# Altium PCB VA_HUB_PCB.PcbDoc (part 9 of 12)
Units mil, origin at the board's own origin, x right, y up, seen from the top; angles counter-clockwise.
Board outline 4408 x 3619 mil, 8 copper layers (Top Layer, Routing 1, Routing 2, Power Plane, GND Plane, Routing 3, Routing 4, Bottom Layer), stack 85.156 mil thick; 569 components, 440 nets, 2911 pads, 1518 vias.
Unrouted connection lines stored in the file: 46.
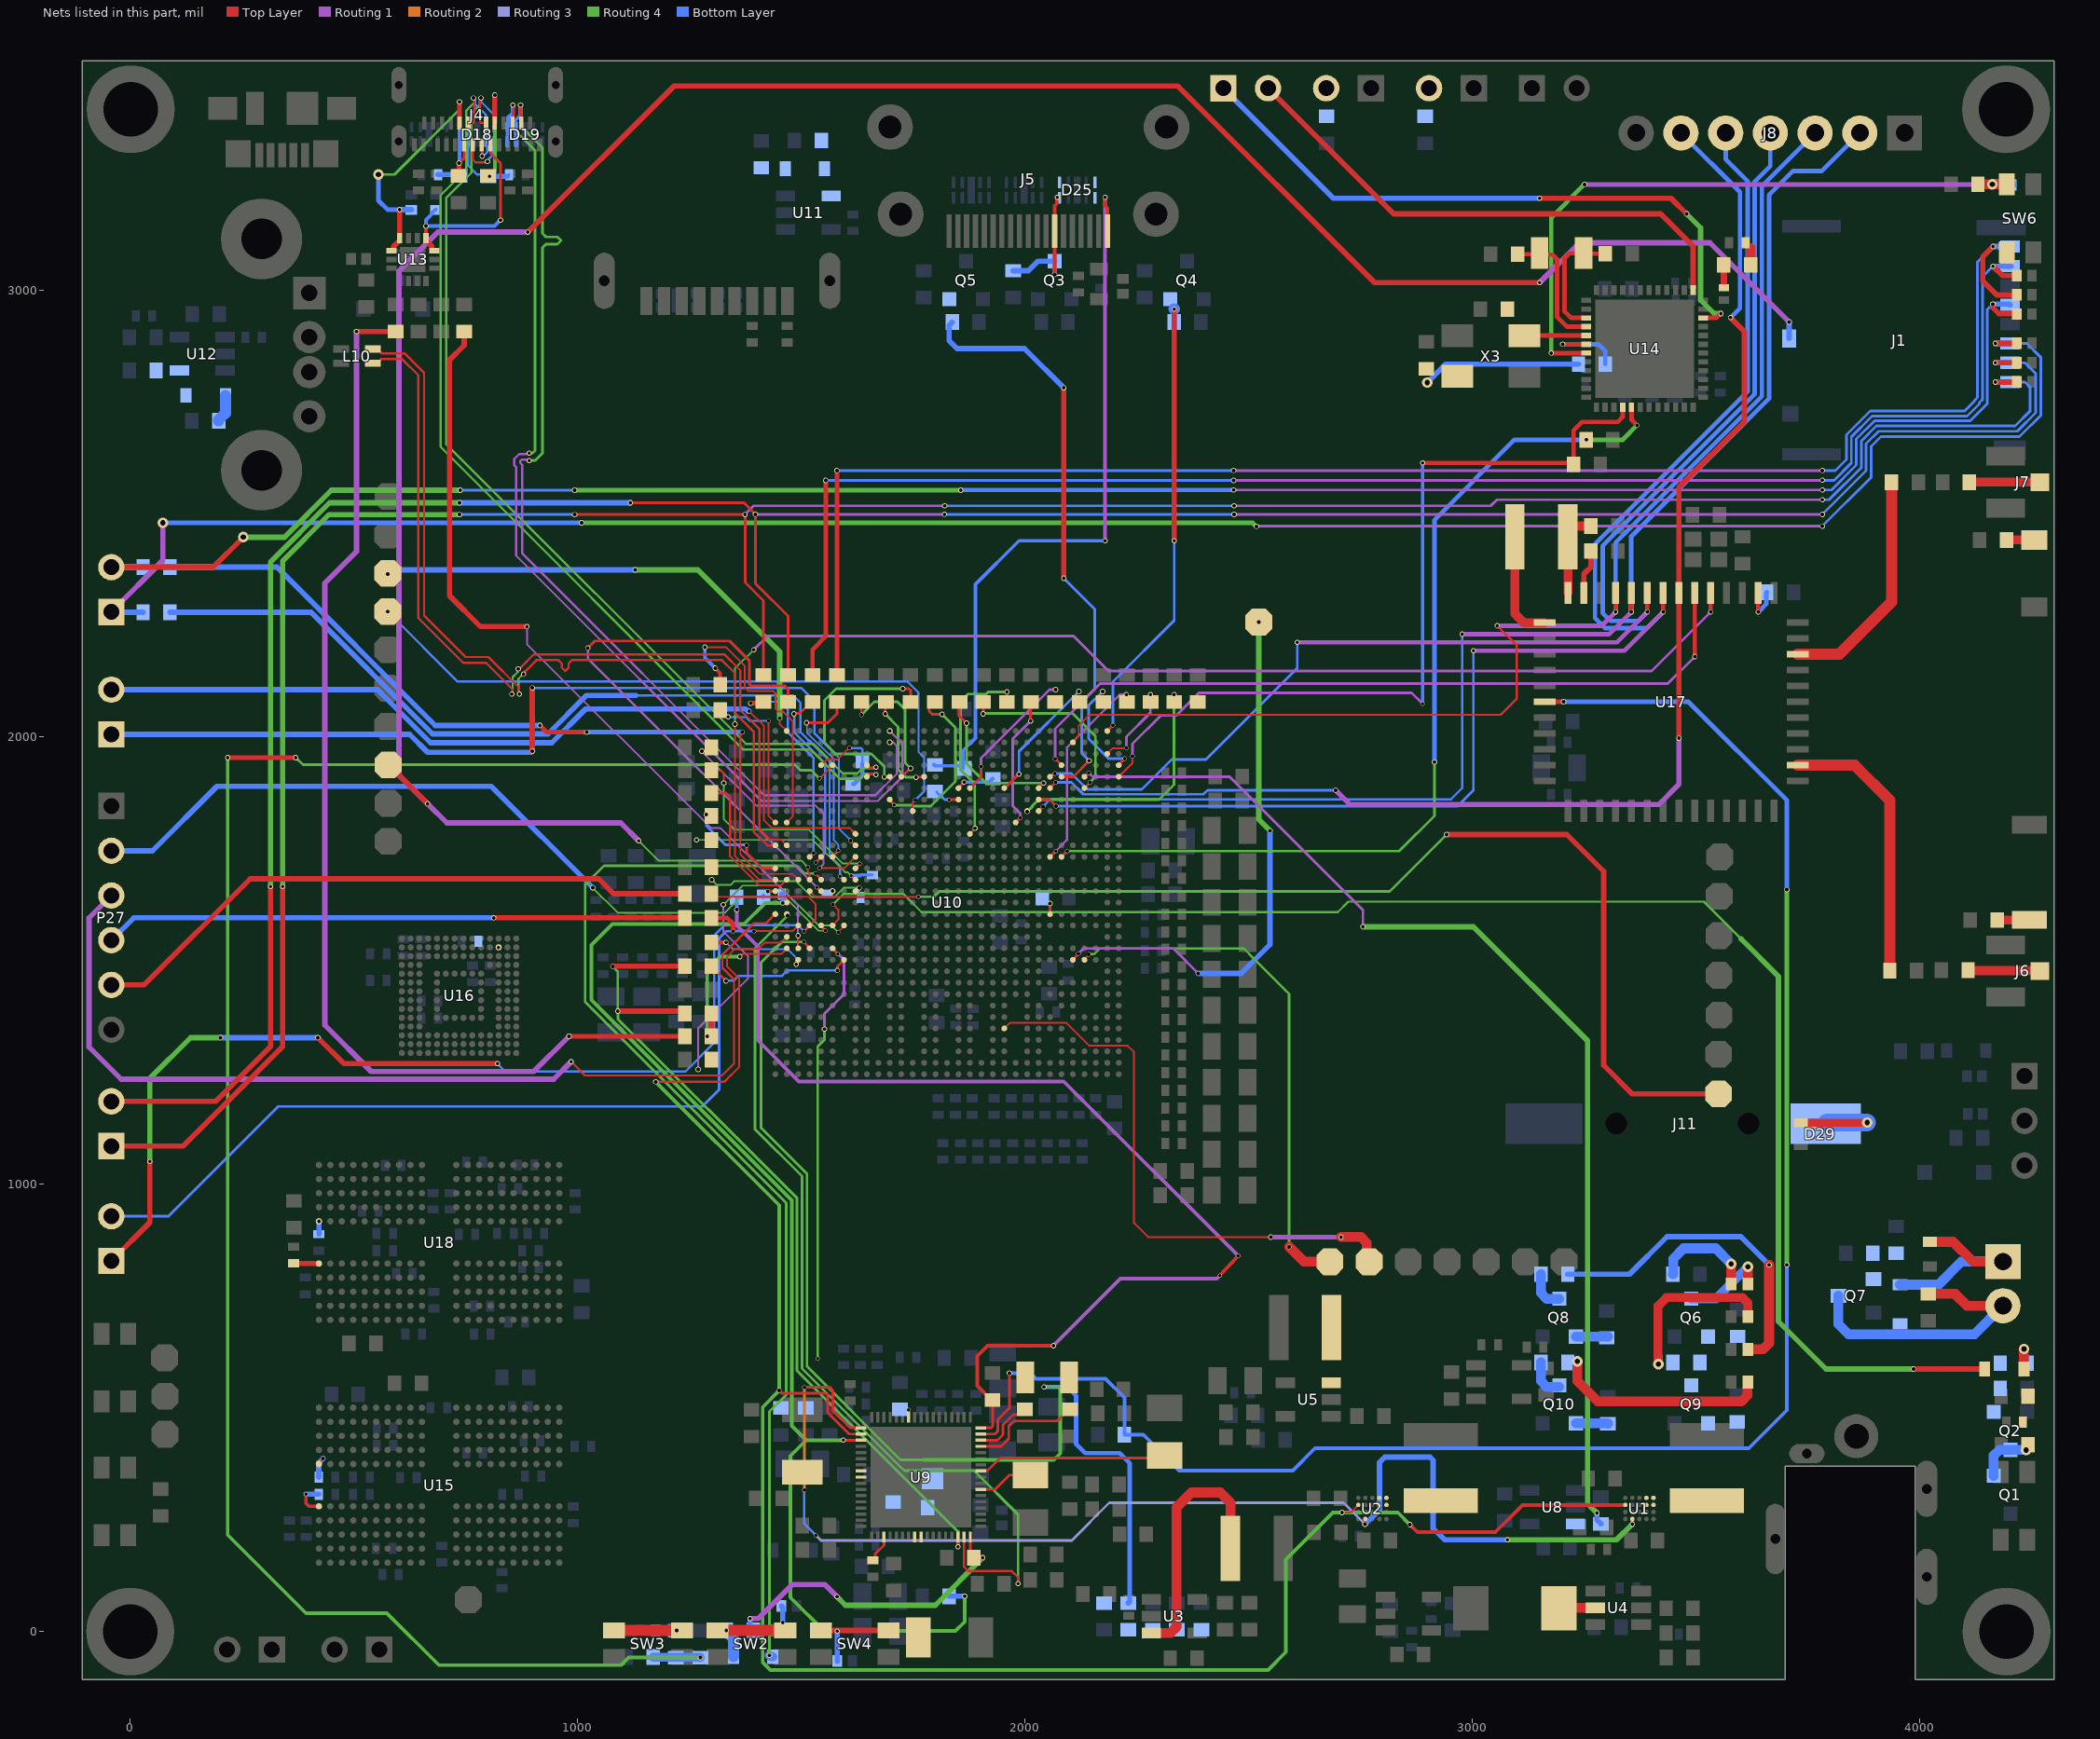
[diagram p12: the nets of this part, all layers, seen from the top]

## Via types
v1: diameter 9.84, hole 7.87, Top Layer to Bottom Layer, 821 vias
v2: diameter 11.81, hole 7.87, Top Layer to Bottom Layer, 575 vias
v3: diameter 23.62, hole 11.81, Top Layer to Bottom Layer, 122 vias

## Nets (pads, with @x,y where several pads share a name; then routed paths per layer and width w, separated by ;. In a path a pad name is that pad's centre, name@x,y a point inside that pad or via, vN(x,y) a via of type N, cw(c..) or ccw(c..) an arc to the next point about the centre after c; other vN are vias at no path point) (continued)
HDMI_OUT.PORT_HPD: D8.2 D25.5 D25.6 J5.19 R53.2 | length 1667.1
  Top Layer w8: v2(2179.55,3207) 2179.55,3188.44 2184.99,3183 J5.19@2184.99,3131.68
  Routing 1 w8: v2(2179.55,2438.82) v2(2179.55,3207)
  Bottom Layer w8: R53.2@1797,1938 1799.34,1935.66 1856.39,1935.66 1862,1930.06 1862,1970 1890,1998 1890,2341.84 1986.99,2438.82 v2(2179.55,2438.82)
HOST1_N: L10.1 U10.AA31 | length 1986.9
  Top Layer w5: L10.1@542.43,2867.75 552.28,2867.75 562.02,2858 613.38,2858 657,2814.38 657,2272 750,2179 800.96,2179 868.09,2111.86 868.09,2102.33 868.7,2101.73 868.7,2097.3 v2(870,2096) ; v2(879.35,2140.65) 879.35,2142.5 884,2147.15 884,2148 908,2172 940,2172 957.5,2172 965,2164.5 965,2155.28 972.5,2147.78 980,2155.28 980,2164.5 987.5,2172 1064,2172 1323,2172 1351,2144 1351,2055 1394,2012 1394,1788.62 1424.75,1757.87 U10.AA31@1442.33,1757.87
  Routing 4 w5: v2(870,2096) 868.7,2097.3 868.7,2101.73 868.09,2102.33 868.09,2130.69 878.05,2140.65 v2(879.35,2140.65)
HOST1_P: L10.4 U10.AA30 | length 1987.4
  Top Layer w4: 1430.13,1770.87 1454.92,1770.87 U10.AA30@1467.92,1757.87
  Top Layer w5: L10.4@542.43,2836.25 552.28,2836.25 561.02,2845 608,2845 644,2809 644,2266.62 744.62,2166 795.57,2166 855.09,2106.48 855.09,2102.33 854.49,2101.73 854.49,2097.3 v2(853.19,2096) ; v2(867.46,2152.54) 869.3,2152.54 873.96,2157.19 874.81,2157.19 902.62,2185 1328.38,2185 1364,2149.38 1364,2060.38 1407,2017.38 1407,1794 1430.13,1770.87
  Routing 4 w5: v2(853.19,2096) 854.49,2097.3 854.49,2101.73 855.09,2102.33 855.09,2134.09 866.16,2145.16 866.16,2151.24 v2(867.46,2152.54)
HW_ID: R58.1 R59.1 U10.AH27 | length 191.4
  Top Layer w4: U10.AH27@1544.69,1937 1557.68,1950 1582,1950 v1(1608,1976)
  Bottom Layer w5: v1(1608,1976) 1608.93,1975.07 1634.07,1975.07 1637,1972.14 R59.1@1637,1947
  Bottom Layer w10: R58.1@1616,1895 1618.5,1895 1637,1913.5 R59.1@1637,1941
I2C0_SCL_PMIC: R43.2 U1.A3 U2.A3 U9.19 U10.N30 | length 4573.4
  Top Layer w4: 1344,1245 1361,1262 1361,1461 1334,1488 1334,1508 1353,1527 1406,1527 1419.35,1540.35 1455.12,1540.35 U10.N30@1467.92,1553.14 ; v2(2709,266) 2728.5,266 U2.A3@2745.58,283.07
  Top Layer w5: v2(1174.91,1229) 1328,1229 1344,1245
  Top Layer w6: v1(1450.82,538.82) 1456.64,533 1555.49,533 1559,529.49 1559,490 1607.35,441.65 U9.19@1634.01,441.65
  Top Layer w8: v2(2861,239) 2878,222 3052,222 3113.07,283.07 U1.A3@3342.58,283.07
  Routing 4 w8: v2(1174.91,1229) 1450.82,953.09 v1(1450.82,538.82) 1414.19,502.19 1414.19,-69.19 1431,-86 2544,-86 2583.88,-46.12 2583.88,160.88 2689,266 v2(2709,266) 2834,266 v2(2861,239)
I2C0_SDA_PMIC: R41.2 U1.B1 U2.B1 U9.18 U10.M26 | length 3697.9
  Top Layer w6: v1(1507,546) 1564,546 1571,539 1571,493.56 1609.13,455.42 U9.18@1634.01,455.42 ; U10.M26@1570.28,1527.55 1570.28,1527.14 1582,1515.42 v1(1582,1515) ; v2@2761.07,240.07 2761.07,251.33 U2.B1@2761.33,251.58 ; v2(3358.07,240.07) U1.B1@3358.07,251.33
  Routing 1 w6: v2(1552,1347) 1552,1381.32 1596,1425.32 1596,1504 1591.75,1508.25 1589.79,1508.25 1583.04,1515 v1(1582,1515)
  Routing 4 w6: v1(1537,610.42) 1537,1308 1552,1323 v2(1552,1347)
  Routing 4 w12: v2@3080,205 3323,205 v2(3358.07,240.07)
  Routing 2 w6: v1(1507,316.77) v1(1507,546)
  Routing 3 w6: v1(1533,215) 1544.18,203.82 2104.82,203.82 2189,288 2712.64,288 v2(2760.82,239.82)
  Bottom Layer w5: v1(1507,316.77) 1507,241 v1(1533,215)
  Bottom Layer w12: v2(2760.82,239.82) 2793,272 2793,378 2805,390 2905.97,390 2913,382.97 2913,230.82 2938.82,205 v2(3079,205)
I2C3_HDMI.I2C3_SCL_HDMI: Q5.2 R94.1 U10.AG6 | length 1302.2
  Top Layer w6: U10.AG6@2082.09,1911.41 2108.41,1911.41 v2(2144,1947)
  Top Layer w12: v2(2087,2355) v2(2087,2781)
  Bottom Layer w6: v2(2087,2355) 2156,2286 2156,2107 2127,2078 2127,1964 v2(2144,1947)
  Bottom Layer w12: R94.1@1837.82,2927.82 1830.93,2920.93 1830.93,2886.57 1848.5,2869 1999,2869 v2(2087,2781)
I2C3_HDMI.I2C3_SDA_HDMI: Q4.2 R92.1 U10.AL2 | length 1006.6
  Top Layer w6: U10.AL2@2184.45,2013.77 v1(2197.25,2026.57)
  Top Layer w12: v2(2334,2438.82) 2334,2956 v2@2335,2957
  Bottom Layer w6: v1(2197.25,2026.57) 2197.25,2123.93 2334,2260.68 v2(2334,2438.82)
  Bottom Layer w25: v2(2334,2957) v2@2335,2957
I2C8.I2C8_SCL: SB7.1 SB27.2 | length 2548.6
  Top Layer w10: v2@981.18,1330.82 SB7.1@1239.82,1330.82
  Top Layer w12: v2(506.18,2906.82) SB27.2@593.82,2906.82 ; v2(981,1331) v2@981.18,1330.82
  Routing 1 w12: v2(506.18,2906.82) 506.18,2415.18 435,2344 435,1550 435,1356 539,1252 902,1252 v2(981,1331)
I2C8.I2C8_SDA: SB24.2 U10.M29 | length 1788.8
  Top Layer w4: v2@1493,1554 1493,1528.06 U10.M29@1493.51,1527.55
  Top Layer w12: SB24.2@746.82,2906.82 746.82,2875.82 714,2843 714,2316.21 783.21,2247 v2(887,2247)
  Routing 1 w4: v2(887,2247) 887,2208 1298.18,1796.82 1319.18,1796.82 1493,1623 v2@1493,1554
  other v2: 1493,1556
JTAG_TMS: P29.1 U10.AA24 | length 2102.9
  Top Layer w6: v1(1610.61,1768.61) v1(1610.61,1768.61) U10.AA24@1621.46,1757.87 U10.AA24@1621.46,1757.87
  Top Layer w12: v2(899,1968.41) v2@899,2109
  Bottom Layer w4: 1575.9,1962.1 1584,1954 1584,1796 1610.61,1769.39 v1(1610.61,1768.61)
  Bottom Layer w5: v2(899,2110) 1500,2110 1530,2080 1530,2008 1575.9,1962.1
  Bottom Layer w12: P29.1@-42.18,2006.07 624.93,2006.07 665,1966 896.59,1966 v2(899,1968.41)
JTAG_TRSTN: P29.2 U10.AB24 | length 1983.5
  Top Layer w4: v1(1384,2058) 1417,2025 1417,1814 1434.74,1796.26 1608.66,1796.26 1615.06,1789.86
  Top Layer w6: 1615.06,1789.86 U10.AB24@1621.46,1783.46
  Bottom Layer w12: P29.2@-42.18,2106.07 552.93,2106.07 671.64,1987.36 942.36,1987.36 1018,2063 1375.93,2063 1380.93,2058 v1(1384,2058)
LOG_DVS_PWM: R7.1 R8.1 U10.M28 | length 2559.1
  Top Layer w6: v1(1506.14,1541.87) 1506.14,1541.19 1518.41,1528.93 U10.M28@1518.41,1528.32
  Routing 4 w6: v1(1506.14,1541.87) 1456.64,1541.87 1410,1495.23 1410,1126.45 1513,1023.45 1513,593 1722,384 1774,384
  Routing 4 w8: 1774,384 2065,384 2079,398 2079,542.31 2074.31,547 v2(2043,547)
  Bottom Layer w10: v2(2043,547) 2095,547 2115,527 2115,419 2135,399 2212,399 2234.82,376.18 R7.1@2234.82,67.03
  Bottom Layer w12: R7.1@2231.62,63.82 R7.1@2234.82,67.03
NetANT1_1: ANT1.1 SB30.1 | length 72.3
  Top Layer w20: SB30.1@4173.82,1590.82 4174.17,1591.17 4245.47,1591.17 ANT1.1@4245.82,1591.52
NetANT2_1: ANT2.1 SB31.1 | length 62.1
  Top Layer w20: SB31.1@4194.82,2440.82 4194.92,2440.72 4256.72,2440.72 ANT2.1@4256.82,2440.63
NetC2_1: C2.1 R5.2 R6.2 R7.2
NetC24_2: C24.2 Q1.1 Q2.3 R22.1 | length 123.4
  Bottom Layer w22: Q1.1@4166.02,348.14 4166.02,393.29 4178.91,406.18 Q2.3@4203.42,406.18 4203.78,405.82 v3(4238.82,405.82)
NetC27_2: C27.2 D3.1 R24.2 | length 45
  Top Layer w22: D3.1@4233.72,586.82 4233.77,586.87 4233.77,631.77 v3(4233.82,631.82)
NetC34_2: C34.2 D6.1 R28.1
NetC45_2: C45.2 U9.37 | length 62.1
  Top Layer w6: C45.2@1660.82,159.33 1665.82,164.32 1665.82,173.82 1685.19,193.19 U9.37@1685.19,211.33
NetC50_2: C50.2 U9.11 | length 17.1
  Top Layer w5: v1(1740,496) 1740.15,495.85 1740.15,479.2 U9.11@1740.31,479.05
NetC182_2: C182.2 R103.1 | length 37.5
  Top Layer w22: R103.1@3622.82,3055.82 3622.82,3093.32
NetC230_2: C230.2 U16.C2
  other v1: 823.42,1529.36
NetC239_2: C239.2 U17.2 | length 619.5
  Top Layer w25: U17.2@3727.7,1937.09 3855.55,1937.09 3933.82,1858.82 C239.2@3933.82,1477.82
NetC240_2: C240.2 U17.9 | length 526.5
  Top Layer w25: U17.9@3727.7,2185.12 3821.12,2185.12 3937.82,2301.82 C240.2@3937.82,2569.82
NetC245_1: C245.1 L12.1 U17.25 | length 194.2
  Top Layer w20: L12.1@3213.88,2447.82 3213.88,2460.17 3225.53,2471.82 C245.1@3265.82,2471.82 ; U17.25@3214.19,2322.84 L12.1@3214.19,2447.51
  Top Layer w25: L12.1@3213.88,2447.82 L12.1@3214.19,2447.51
NetD4_2: D4.2 R23.1 SW3.1 | length 196.8
  Top Layer w25: SW3.1@1082.03,2.35 1174.85,2.35 SW3.1@1233.61,2.35
  Bottom Layer w20: D4.2@1174.85,2.35 1175.38,1.82 R23.1@1219.82,1.82
  other v2: 1221.85,2.35
NetD15_1: D15.1 R80.1 U11.4
NetD15_2: D15.2 R79.1
NetD21_1: D21.1 R84.1 U12.4
NetD21_2: D21.2 R83.1 | length 67.7
  Bottom Layer w20: R83.1@198,2707 198.18,2707.18 199.18,2706.18 R83.1@201.18,2708.18
  Bottom Layer w25: R83.1@198,2707 198,2709.5 212.8,2724.3 212.8,2763.9 D21.2@212.9,2764
NetD29_1: D29.1 J11.1 | length 241.1
  Top Layer w18: D29.1@3734.82,1137.82 3734.91,1137.91 3882.91,1137.91 v3(3883,1138)
  Bottom Layer w40: J11.1@3791.05,1135.82 3793.23,1138 v3(3883,1138)
NetD30_1: D30.1 FB1.1 J12.1 | length 432.7
  Top Layer w22: FB1.1@4023.82,871.38 4075.26,871.38 4119.61,827.03 J12.1@4186.82,827.03
  Bottom Layer w22: D30.1@3956.82,775.62 4042.62,775.62 4094.03,827.03 J12.1@4186.82,827.03
NetD30_2: D30.2 J12.2 Q7.3 SB33.1 | length 645.5
  Top Layer w22: SB33.1@4019.82,754.82 4079.82,754.82 4106.82,727.82 4186.04,727.82 J12.2@4186.82,728.61
  Bottom Layer w22: Q7.3@3818.82,750.82 3818.82,687.82 3841.82,664.82 4123.04,664.82 J12.2@4186.82,728.61
NetJ6_1: J6.1 SB29.2 | length 161.2
  Top Layer w20: SB29.2@4108.82,1478.82 4109.82,1477.82 4268.18,1477.82 J6.1@4269.18,1476.82
NetJ7_1: J7.1 SB32.2 | length 157.4
  Top Layer w20: SB32.2@4111.82,2569.82 J7.1@4269.18,2569.82
NetL1_2: L1.2 U1.D3 U1.D4 U1.E3 U1.E4
NetL2_2: L2.2 U2.D3 U2.D4 U2.E3 U2.E4
NetL3_1: L3.1 U4.2 | length 81.8
  Top Layer w22: L3.1@3194.25,51.82 3195.25,52.82 U4.2@3275.64,52.82
NetL4_2: L4.2 U3.3 | length 574.7
  Top Layer w22: U3.3@2283,-3.01 2325.94,-3.01 2338.82,9.87 2338.82,276.82 2372.82,310.82 2436.82,310.82 2459.77,287.88 L4.2@2459.77,185.82
NetL5_2: L5.2 U5.3
NetL6_2: L6.2 U9.42 U9.43
NetL7_2: L7.2 U9.25 U9.26
NetL8_2: L8.2 U9.58 | length 126.9
  Top Layer w6: U9.58@1901.73,317.63 1933.63,317.63 1965.82,349.82 L8.2@2012.82,349.82 ; L8.2@2011.09,364.31 L8.2@2012.82,366.04
NetL9_2: L9.2 U9.61 | length 439
  Top Layer w6: U9.61@1908.82,358.82 1909.51,359.51 1916.89,359.51 1945.2,387.82 L9.2@2335.82,387.82
NetL11_1: L11.1 R103.2 | length 50.4
  Top Layer w8: L11.1@3561.82,3005.82 L11.1@3562.82,3006.82
  Top Layer w15: L11.1@3562.82,3006.82 R103.2@3562.82,3055.82
NetL12_2: L12.2 U17.26 | length 246.4
  Top Layer w20: L12.2@3095.77,2447.82 3095.77,2275.88 3104.85,2266.79 3115.66,2255.99 U17.26@3161.95,2255.99
NetLED1_1: LED1.1 R114.1 | length 233.9
  Top Layer w22: LED1.1@3579.12,776.82 v3@3579.12,821.82
  Bottom Layer w22: R114.1@3449.22,798.82 3449.61,799.21 3449.61,833.61 3472.82,856.82 3544.42,856.82 v3(3579.42,821.82)
NetLED1_2: LED1.2 Q6.3 | length 196.4
  Top Layer w22: v3@3616.52,815.52 LED1.2@3616.52,776.82 LED1.2@3617.51,777.81
  Bottom Layer w20: Q6.3@3490.22,744.15 3545.15,744.15 v3(3616.82,815.82)
NetLED2_2: LED2.2 R120.2 | length 739.3
  Top Layer w22: LED2.2@3616.52,630.82 3649.82,630.82 3664,645 v2(3664,820)
  Bottom Layer w12: R120.2@3213.82,798.82 3351.82,798.82 3435.82,882.82 3601.18,882.82 v2(3664,820)
NetLED3_2: LED3.2 R121.2 | length 375.2
  Top Layer w20: v3(3416.81,597.82) 3416.12,598.52 3416.12,616.53 3415.82,616.82 3415.82,727.93 3434.71,746.82 3604.81,746.82 3616.52,735.11 LED3.2@3616.52,703.82
NetLED4_2: LED4.2 R122.2 | length 478.3
  Top Layer w22: v3(3235.19,603.82) 3235.5,603.51 3235.5,560.15 3280.82,514.82 3602.43,514.82 3615.32,527.71 3615.32,556.62 LED4.2@3616.52,557.82
NetP23_1: P23.1 U10.E11 | length 1287.5
  Top Layer w4: U10.E11@1954.14,1348.42 1966.72,1361 2093,1361 2144,1310 2230,1310 2244,1296 2244,913.3 2275.3,882 v2(2550,882)
  Top Layer w22: v2(2707,882) 2751.56,882 2764.44,869.11 2764.44,832.2 P23.1@2769.82,826.82
  Routing 1 w10: v2(2550,882) v2@2706.51,882
NetP26_1: P26.1 U10.L4 | length 1182.9
  Top Layer w4: U10.L4@2133.27,1501.96 v1(2143.11,1514.41)
  Top Layer w6: v1@2142.37,1513.67 v1(2143.11,1514.41)
  Top Layer w22: v1(2591,860) 2624.18,826.82 P26.1@2682,826.82
  Routing 4 w5: v1(2143.11,1514.41) 2154.7,1514.41 2167.62,1527.33 2489.67,1527.33 2512,1505
  Routing 4 w6: 2512,1505 2591,1426 v1(2591,860)
NetP32_1: P32.1 U10.U28 | length 2589
  Top Layer w4: U10.U28@1519.1,1655.51 1531.78,1642.82 v1(1761.82,1642.82)
  Top Layer w12: v2(2943,1782) 3212,1782 3294,1700 3294,1266 3357.81,1202.19 P32.1@3550.82,1202.19
  Routing 4 w6: v1(1761.82,1642.82) 1796.44,1642.82 1808.8,1655.19 2816.19,1655.19 v2(2943,1782)
NetP34_1: P34.1 U10.AL30 | length 1139.9
  Top Layer w4: v1(1452,2042) 1452,2029.69 U10.AL30@1467.92,2013.77
  Routing 4 w12: v2(1129,2374) 1269,2374 1452,2191 v1(1452,2042)
  Bottom Layer w12: v2(575.82,2364.18) 585.65,2374 v2(1129,2374)
NetP35_1: P35.1 U10.AD19 | length 1542.3
  Top Layer w4: U10.AD19@1749.41,1834.64 1749.41,1853.41 v1(1755,1859)
  Bottom Layer w4: 1762.16,2090 1762.16,1966.84 1768.58,1960.42
  Bottom Layer w5: v2(575.82,2280.62) 732.44,2124 1738,2124 1762.16,2099.84 1762.16,2090 ; v1(1755,1859) 1775,1879 1775,1954 1768.58,1960.42
NetP36_2: P36.2 R101.1
NetP37_2: P37.2 R102.1
NetP41_1: P41.1 U10.L5 | length 1232.8
  Top Layer w6: U10.L5@2107.68,1501.96 2107.68,1502.82 2120,1515.14 v1(2120,1516)
  Routing 1 w6: v1(2120,1516) 2131.33,1527.33 2332.37,1527.33 v1(2387.9,1471.8)
  Routing 4 w12: v2(2523,2257) 2523,1816 v1(2548,1791)
  Bottom Layer w12: v1(2387.9,1471.8) 2483.8,1471.8 2548,1536 v1(2548,1791)
NetQ2_1: Q2.1 R24.1 R25.1
NetQ6_1: Q6.1 R115.1
NetQ7_1: Q7.1 R117.1 R119.2
NetQ8_1: Q8.1 R123.1 | length 71.7
  Bottom Layer w22: Q8.1@3232.22,659.5 3232.39,659.66 3303.66,659.66 R123.1@3303.82,659.82
NetQ8_3: Q8.3 R120.1 | length 88.1
  Bottom Layer w22: R120.1@3153.82,798.82 3153.82,757.03 3166.71,744.15 Q8.3@3194.82,744.15
NetQ9_1: Q9.1 R124.1
NetQ9_3: Q9.3 R121.1
NetQ10_1: Q10.1 R125.1 | length 71.9
  Bottom Layer w22: Q10.1@3232.22,465.5 3232.56,465.16 3303.48,465.16 R125.1@3303.82,464.82
NetQ10_3: Q10.3 R122.1 | length 88.1
  Bottom Layer w22: R122.1@3153.82,601.82 3153.82,560.03 3166.71,547.15 Q10.3@3194.82,547.15
NetR46_2: R46.2 U15.A5 | length 80.3
  Top Layer w8: v1(393,307) 393,287 400,280 U15.A5@421.91,280
  Bottom Layer w12: v1(393,307) R46.2@421.5,307
NetR51_1: R51.1 U10.R7 | length 23.7
  Top Layer w6: U10.R7@2056.5,1604.33 v2(2056.5,1628)
NetR52_1: R52.1 U10.AF15 | length 86.1
  Top Layer w6: U10.AF15@1851.77,1885.82 1851.77,1886.81 v2(1864.37,1899.41)
  Bottom Layer w4: v2(1864.37,1899.41) 1870.98,1899.41
  Bottom Layer w8: 1870.98,1899.41 1920.95,1899.41 R52.1@1928.55,1907
NetR53_1: R53.1 U10.AE15 | length 57.4
  Top Layer w6: v1(1831,1859.71) 1831.26,1859.97 1851.51,1859.97 U10.AE15@1851.77,1860.23
  Bottom Layer w6: R53.1@1803,1878 1803,1876.5 1813.5,1866 1815,1866 1821,1860 1830.71,1860 v1(1831,1859.71)
NetR56_1: R56.1 U10.L29 | length 229
  Top Layer w4: R56.1@1299.82,1540.82 R56.1@1300,1541
  Top Layer w8: v2(1489,1492) U10.L29@1493.51,1501.96
  Top Layer w10: R56.1@1300,1541 v2(1332,1541)
  Bottom Layer w4: v2(1332,1541) 1347,1526 1469.47,1526 1489,1506.47 v2(1489,1492)
NetR60_2: R60.2 U10.AF14 | length 307.8
  Top Layer w6: U10.AF14@1877.37,1885.82 1902,1910.46 v1(1902,1934)
  Routing 1 w6: v1(1902,1934) 1902,1953 2055,2106 v2(2069,2106)
NetR61_2: R61.2 U10.AF11 | length 286.3
  Top Layer w6: U10.AF11@1954.14,1885.82 1954.98,1885.82 1986.16,1917 v2(1987,1917)
  Bottom Layer w6: v2(1987,1917) 1987,1968 v2(2121,2102)
NetR62_1: R62.1 U10.U31 | length 19.4
  Top Layer w6: v1(1425.43,1654.94) U10.U31@1442.33,1654.94
  Bottom Layer w10: R62.1@1415.82,1641.82 R62.1@1415.82,1644.32
NetR67_1: R67.1 U10.V25 | length 2000.9
  Top Layer w6: v1(1587,1689) 1587.48,1689 1595.39,1681.1 U10.V25@1595.87,1681.1
  Bottom Layer w5: 1130.82,2092.82 1482.18,2092.82 1498.69,2076.31 1498.69,2010.88 1563.58,1945.99 1563.58,1735.42 1587,1712 v1(1587,1689)
  Bottom Layer w12: R67.1@88.82,2278.82 404.22,2278.82 676.04,2007 934,2007 1019.82,2092.82 1130.82,2092.82
NetR68_1: R68.1 U10.Y27 | length 439.9
  Top Layer w6: v2(1484,2051.75) 1485.11,2052.86 1496.9,2052.86 1522.87,2078.82 R68.1@1525.37,2078.82 ; v1@1531.96,1719.14 U10.Y27@1544.69,1731.87
  Bottom Layer w5: v2(1484,2051.75) 1485,2050.75 1485,2010.42 1553.58,1941.84 1553.58,1740.35 v1(1532.96,1719.73)
NetR69_2: R69.2 U10.V29 | length 1861.1
  Top Layer w4: 1364,1771 1364,1738 1408,1694 1480.61,1694 U10.V29@1493.51,1681.1
  Top Layer w6: 1364,1771 1364,2005.56 1369,2010.56 v1(1369,2011)
  Top Layer w10: v2(916,2026.09) 931.09,2011 v2(1020.82,2011)
  Bottom Layer w10: v2(1020.82,2011) v1(1369,2011)
  Bottom Layer w12: R69.2@88.82,2379.82 328.18,2379.82 681.91,2026.09 v2(916,2026.09)
NetR70_1: R70.1 U10.Y26 | length 436.9
  Top Layer w6: v2(1512.09,2032) 1559.72,2032 1580.14,2052.42 R70.1@1580.14,2078.82 ; U10.Y26@1570.28,1732.69 1570.28,1732.78 1583,1745.5 v1(1583,1746)
  Bottom Layer w4: v2(1512.09,2032) 1513,2031.09 1513,2010 1573.08,1949.92 1573.08,1769.06 1583,1759.14 v1(1583,1746)
NetR71_1: R71.1 U10.Y28 | length 478.3
  Top Layer w6: U10.Y28@1519.1,1732.28 1519.19,1732.28 1527.91,1741 v1(1528,1741)
  Top Layer w10: v2(1387.24,2075.59) 1412.59,2075.59 R71.1@1415.82,2078.82
  Bottom Layer w5: v2(1387.24,2075.59) 1388.15,2076.5 1400.65,2076.5 1403.15,2079 1452.42,2079 1470.59,2060.82 1470.59,2010.41 1528,1953 v1(1528,1741)
NetR72_1: R72.1 U10.U27 | length 1319.2
  Top Layer w6: v2(1023,2199) 1039,2215 1340,2215 1384,2171 1384,2118.51 1387.51,2115 1463,2115 1470.59,2107.41 R72.1@1470.59,2078.82 R72.1@1470,2078.23 ; v1(1535,1664) 1535.6,1664 1544.09,1655.51 U10.U27@1544.69,1655.51
  Routing 1 w5: v2(1023,2199) 1023,2176 v1(1535,1664)
NetR75_1: R75.1 U10.AC31 | length 329
  Top Layer w4: v1(1427,2036) 1427,1824.38 U10.AC31@1442.33,1809.05
  Bottom Layer w4: v2(1337,2045) 1376,2045 1385,2036 v1(1427,2036) v1@1429,2036
NetR76_2: R76.2 U10.AC30 | length 643.1
  Top Layer w4: v2(1285,2201) 1332,2201 1374,2159 1374,2110.64 1381.64,2103 1437,2103 1443,2097 1443,2063 1449,2057 1460,2057 1481,2036 1481,1822.13 U10.AC30@1467.92,1809.05
  Top Layer w8: v2(1308,2154) 1318.82,2143.18 R76.2@1318.82,2116.82
  Bottom Layer w8: v2(1285,2201) 1285,2177 v2(1308,2154)
NetR77_1: R77.1 U10.AG18 | length 230.2
  Top Layer w6: v2(1688,2051.75) 1688,2077.14 R77.1@1689.68,2078.82 ; v2(1757,1910) 1757.71,1910.71 1774.3,1910.71 U10.AG18@1775,1911.41
  Routing 4 w6: v2(1688,2051.75) 1716.72,2023.03 1716.72,1927.28 1734,1910 v2(1757,1910)
NetR78_1: R78.1 U10.AG20 | length 311
  Top Layer w6: R78.1@1634.91,2078.82 1635,2078.73 v1(1635,2050) ; U10.AG20@1723.82,1911.41 1725.12,1911.41 1743.71,1930 v2(1745,1930)
  Routing 4 w6: v1(1635,2050) 1663.82,2078.82 1715.18,2078.82 1732.33,2061.67 1732.33,1942.67 v2(1745,1930)
NetR81_2: R81.2 U10.AE21 | length 398.6
  Top Layer w6: U10.AE21@1698.23,1860.23 1698.23,1858.81 1708,1849.04 v1(1708,1848) ; R81.2@1799.22,2078.82 1797.93,2078.82 1785.93,2066.82 1785.93,2058.34 1793.27,2051 v2(1815,2051)
  Routing 4 w6: v1(1708,1848) 1748.19,1848 1750.61,1845.58 1789.76,1845.58 1845,1900.82 1845,2021 v2(1815,2051)
NetR82_2: R82.2 U10.AG21 | length 516.2
  Top Layer w6: v2(1686,1911) 1686.21,1911.21 1698.03,1911.21 U10.AG21@1698.23,1911.41 ; v2(1727,2108) 1740.94,2108 1744.45,2104.49 R82.2@1744.45,2078.82
  Routing 4 w6: v2(1686,1911) 1686,1934 1657.41,1962.59 1577.41,1962.59 1552,1988 1552,2082.17 1577.83,2108 v2(1727,2108)
NetR100_2: R100.2 U14.6 | length 183.4
  Top Layer w10: v2(3202.34,2878.34) U14.6@3254.86,2878.34
  Bottom Layer w10: v2(3202.34,2878.34) 3282.3,2878.34 3297.82,2862.82 R100.2@3297.82,2833.82
NetR106_1: R106.1 U15.A8 | length 61.4
  Top Layer w6: U15.A8@421.91,374.49 v1(431,387)
  Bottom Layer w12: R106.1@421.5,345 421.5,377.5 v1(431,387)
NetR107_2: R107.2 U18.A5 | length 57.2
  Top Layer w12: R107.2@365,823.5 365.37,823.13 421.54,823.13 U18.A5@421.91,822.76
NetR109_1: R109.1 U18.A8 | length 28.5
  Bottom Layer w12: R109.1@422,888.5 v1(422,917)
NetR112_1: R112.1 U17.13 | length 94.8
  Top Layer w10: v2@3639.7,2279.82 U17.13@3639.7,2322.52
  Bottom Layer w10: v2(3639.85,2279.82) 3640.34,2279.82 3657.7,2297.18 3657.7,2322.7 R112.1@3658.82,2323.82
NetR113_1: R113.1 U17.24 | length 99.9
  Top Layer w12: U17.24@3249.94,2322.52 3249.94,2364.94 3265.82,2380.82 R113.1@3265.82,2415.82
NetSB5_2: SB5.2 U10.P25 | length 774.1
  Top Layer w4: v1(1583.09,1563.26) 1583.09,1564.6 1595.87,1577.39 U10.P25@1595.87,1578.74
  Routing 1 w4: v2(1269.82,1256.82) 1269.82,1348.82 1381,1460 1381,1510.25 1326,1565.25 v2@1326,1623
  Routing 4 w4: v2(1326,1625) 1369,1668 1451,1668 1540.26,1578.74 1567.26,1578.74 1582.74,1563.26 v1(1583.09,1563.26)
NetSB6_2: SB6.2 SB7.2 U10.M30 | length 409.5
  Top Layer w4: v2(1363,1509) 1369,1515 1455.36,1515 U10.M30@1467.92,1527.55
  Top Layer w12: v2(1290,1331) 1299.64,1331 SB7.2@1299.82,1330.82 SB6.2@1299.82,1381.82 SB6.2@1299.82,1383.82
  Routing 4 w8: v2(1290,1331) 1290,1480 1319,1509 v2(1363,1509)
NetSB10_2: SB10.2 U10.AF4 | length 425.8
  Top Layer w6: SB10.2@1906.69,2078.82 1907,2078.51 v2(1907,2051.75) ; U10.AF4@2133.27,1885.82 2133.27,1885.97 2146.07,1898.77 v1(2146.07,1898.92)
  Routing 4 w6: v2(1907,2051.75) 1907.8,2052.55 2107.45,2052.55 2157.91,2002.09 2157.91,1911.01 2146.07,1899.17 v1(2146.07,1898.92)
NetSB11_2: SB11.2 U10.AJ2 | length 189.8
  Top Layer w4: U10.AJ2@2184.45,1962.59 2196.95,1975.09 2226.63,1975.09 v1(2227.12,1975.58)
  Routing 1 w6: v1(2227.12,1975.58) 2227.12,2000.62 2281,2054.5 v2(2281,2095)
NetSB12_2: SB12.2 U10.Y7 | length 441.9
  Top Layer w6: U10.Y7@2056.5,1732.28 v1(2069.3,1745.07)
  Routing 1 w5: v1(2069.3,1745.07) 2094.51,1770.29 2094.51,1977.07 2212.44,2095 v2(2227,2095)
NetSB13_2: SB13.2 U10.AH1 | length 238.2
  Top Layer w6: U10.AH1@2210.04,1937 2210.04,1938.55 v1(2223.55,1952.06)
  Bottom Layer w6: v2(2174,2102) 2143,2071 2143,1996 2186.94,1952.06 v1(2223.55,1952.06)
NetSB14_1: SB14.1 U10.AB14 | length 427
  Top Layer w6: U10.AB14@1877.37,1783.46 1877.37,1783.98 1888.86,1795.47 v2(1888.86,1795.98)
  Routing 4 w6: v2(1888.86,1795.98) 1888,1796.84 1888,1895.44 1856,1927.44 1856,2079 1873.19,2096.19 1913.4,2096.19 1918.21,2101 v2(1960,2101)
NetSB15_1: SB15.1 U10.AC10 | length 298.1
  Top Layer w6: U10.AC10@1979.73,1809.05 v1(1990.26,1819.58) ; v2(2013,2036) 2013,2078.33 SB15.1@2013.49,2078.82
  Routing 1 w6: v1(1990.26,1819.58) 1990.26,1828.74 1973,1846 1973,1996 v2(2013,2036)
NetSB16_1: SB16.1 U10.W31 | length 229.8
  Top Layer w6: v1@1378,1759 1378,1741 1412.31,1706.69 1441.7,1706.69 1442.01,1707 U10.W31@1442.33,1706.69
  Bottom Layer w6: v2(1288,1827) 1288,1801.64 1330.64,1759 v1@1378,1759
  other v1: 1378,1758
NetSB17_1: SB17.1 U10.L25 | length 335.9
  Top Layer w6: SB17.1@1299.82,1487.82 1299.82,1485.32 1311.82,1473.32 1313.68,1473.32 v2(1332,1455) ; v2(1581,1478) 1581,1487.09 U10.L25@1595.87,1501.96
  Bottom Layer w5: v2(1332,1455) 1349,1455 1360,1466 1457.54,1466 1469.54,1478 v2(1581,1478)
NetSB18_1: SB18.1 U10.V30 | length 336.6
  Top Layer w4: 1341,1770 1341,1733.27 1405.67,1668.6 1455.42,1668.6 U10.V30@1467.92,1681.1
  Top Layer w6: SB18.1@1299.82,1874.82 1332.4,1874.82 1341,1866.22 1341,1770
NetSB19_1: SB19.1 U10.W24 | length 492.8
  Top Layer w4: SB19.1@1299.82,1925.82 1320.58,1925.82 1327,1919.41 v2(1327,1897) ; U10.W24@1621.12,1706.34 U10.W24@1621.46,1706.69
  Top Layer w6: U10.W24@1621.12,1706.34 1630.96,1716.19 v1(1630.96,1717)
  Routing 4 w4: v2(1327,1897) 1327,1817 1351,1793 1517,1793 1593,1717 v1(1630.96,1717)
NetSB20_1: SB20.1 U10.Y24 | length 546.4
  Top Layer w4: v1(1541,1707) 1596.18,1707 U10.Y24@1621.46,1732.28
  Routing 1 w4: v2(1278,1968.41) 1399.58,1846.82 1532.18,1846.82 1550,1829 1550,1716 v1(1541,1707)
NetSB21_1: SB21.1 SB22.1 U10.AD9 | length 548
  Routing 4 w6: v1(2005.32,1832.9) 2016.41,1844 2016.41,1845.74 2030.68,1860 2300.17,1860 2333.78,1893.62 2333.78,2087
  other v2: 2333.78,2095
NetSB23_1: SB23.1 U10.AF8 | length 351.3
  Top Layer w6: SB23.1@1853.29,2078.82 1853.29,2047.71 v2(1870,2031) ; U10.AF8@2030.91,1885.82 v2@2042,1896.96
  Routing 4 w6: v2(1870,2031) 1870,1940 1912.96,1897.04 2041.96,1897.04 v2(2042,1897)
NRST_: C183.1 R104.1 SW6.1 U14.7 | length 1505.8
  Top Layer w10: v2(3176.82,2858.51) 3254.73,2858.51 U14.7@3254.87,2858.36
  Top Layer w22: R104.1@4130.82,3235.82 4130.93,3235.72 v3(4163.06,3235.72) 4195.19,3235.72 SW6.1@4195.29,3235.61
  Routing 1 w10: v2(3251.28,3235.72) 3259,3235.72 v3(4163.06,3235.72)
  Routing 4 w10: v2(3176.82,2858.51) 3176.82,3161.25 v2(3251.28,3235.72)
  Bottom Layer w22: v3(4163.06,3235.72) C183.1@4206.32,3235.72
OSC32KIN: C31.2 U9.65 X1.2 | length 249
  Top Layer w6: U9.65@1901.73,414.09 1947.09,414.09 1964.23,431.23 1964.23,459.23 1975.82,470.82 2072.37,470.82 2085.37,483.82 2096.37,494.83 C31.2@2100.87,494.83
OSC32KOUT: C32.2 U9.66 X1.1 | length 138.8
  Top Layer w6: U9.66@1901.73,427.87 1938.87,427.87 1950.82,439.82 1950.82,461.82 1973.96,484.96 1990,484.96 C32.2@1999.87,494.83
OTP_OUT_H: D3.2 U10.P26 | length 3553.6
  Top Layer w4: U10.P26@1570.28,1578.74 1583,1591.46 1583,1614 v1(1571,1626)
  Top Layer w12: v2(3986.82,586.82) D3.2@4145.92,586.82
  Routing 4 w5: v1(1571,1626) 1571.44,1626 1594.44,1649 1729,1649 1769.42,1608.58 2699.58,1608.58 2723,1632 3518,1632 3601.5,1548.5
  Routing 4 w12: 3601.5,1548.5 3685,1465 3685,693 3791.18,586.82 v2(3986.82,586.82)
PC14_IN: C186.2 U14.3 X4.2 | length 269.2
  Top Layer w10: U14.3@3255.01,2937.25 3221.4,2937.25 3206.82,2951.82 3206.82,3070.82 3217.82,3081.82 X4.2@3249.25,3081.82 3250.25,3080.82 C186.2@3297.82,3080.82
PC15_OUT: C187.2 U14.4 X4.1 | length 297.6
  Top Layer w10: C187.2@3101.82,3079.82 3148.82,3079.82 X4.1@3150.82,3081.82 3153.96,3078.68 3179.96,3078.68 3189.82,3068.82 3189.82,2939.82 3212.08,2917.56 U14.4@3255.01,2917.56
PH0_IN: C184.2 U14.5 X3.1 | length 138.7
  Top Layer w10: X3.1@3116.63,2897.1 3117.4,2897.88 U14.5@3255.01,2897.88
PH1_OUT: C185.2 R100.1 X3.3 | length 355
  Bottom Layer w12: v3(2899.82,2792.82) 2940.82,2833.82 R100.1@3237.82,2833.82
PMCU_TCK: P28.1 SB8.2 U10.P28 | length 2570.4
  Top Layer w4: SB8.2@1299.82,1649.82 1306.64,1643 1516,1643 1532,1627 1532,1591.64 U10.P28@1519.1,1578.74
  Top Layer w6: v1(1506.3,1565.94) U10.P28@1519.1,1578.74
  Top Layer w12: P28.1@-42.18,828.57 44,914.75 v2(44,1051) ; v2(419.68,1328) 477.68,1270 v2(821,1270)
  Routing 4 w12: v2(44,1051) 44,1237 135,1328 v2(202,1328)
  Bottom Layer w5: v2(821,1270) 839,1252 1241,1252 1306,1317 1306,1557 1328,1579 1493.24,1579 v1(1506.3,1565.94)
  Bottom Layer w12: v2(202,1328) v2(419.68,1328)
PMCU_TMS: P28.2 SB9.2 U10.P29 | length 2073.5
  Top Layer w4: v1@1395,1566 1480.77,1566 U10.P29@1493.51,1578.74
  Top Layer w10: SB9.2@1299.82,1595.82 1334.18,1595.82 1348,1582 v1@1348,1566
  Bottom Layer w6: P28.2@-42.18,928.57 85.57,928.57 331,1174 1279,1174 1317,1212 1317,1551 1331.94,1565.94 v1(1348,1565.94) 1348.06,1566 v1@1395,1566
  other v1: 1395,1565.94
PMIC_INT_L: SB6.1 SB17.2 U9.49 | length 1952
  Top Layer w6: v2(1850.55,189.55) U9.49@1850.55,211.33
  Top Layer w12: v1(1079,1487) 1079.82,1487.82 SB17.2@1239.82,1487.82 ; v2(1090,1387) 1234.64,1387 SB6.1@1239.82,1381.82
  Routing 4 w6: v1(1079,1487) 1090,1476 1090,1384 1090.85,1383.15 1090.85,1369.09 1491,968.94 1491,583 1850.55,223.45
  Routing 4 w8: v2(1850.55,189.55) 1850.55,223.45
PMIC_SLEEP_H: U9.50 U10.R30 | length 2074.7
  Top Layer w5: U9.50@1864.32,211.33 1864.32,185.02 1864.32,144.63 1873.95,135 1971,135 1985,121 v2(1985,107)
  Top Layer w6: U10.R30@1467.92,1604.33 1470,1602.24 v1(1470,1601)
  Routing 4 w6: v1(1470,1601) 1397,1528 1397,1123 1502,1018 1502,588 1730,360 1886.29,360 1985,261.29 v2(1985,107)
PORT_CEC: D25.1 D25.10 J5.13 Q3.3 R91.2 | length 307
  Top Layer w8: v2(2066.88,3034.12) J5.13@2066.88,3131.68 2066.88,3188 2071.59,3192.71 2071.59,3206.27 v2(2072.31,3207)
  Bottom Layer w8: Q3.3@2066.83,3064.15 2066.88,3064.1 v2(2066.88,3034.12)
  Bottom Layer w12: R91.2@1973.82,3042.82 2007.82,3042.82 2029.15,3064.15 Q3.3@2066.83,3064.15
POWER_ON: C44.1 R20.2 R39.1 U9.51 | length 753.2
  Top Layer w6: U9.51@1878.1,211.33 1878.1,171.54 R39.1@1884.82,164.82
  Top Layer w12: R39.1@1884.82,164.82 1885,165 v2(1906,165)
  Routing 1 w12: v2(1386,29) 1404,29 1480,105 1553,105 v2(1580,78)
  Routing 4 w12: v2(1580,78) 1599,59 1800,59 v2(1906,165)
  Bottom Layer w12: v2(1386,29) 1386,9.64 R20.2@1392.82,2.82
  Bottom Layer w20: R20.2@1392.82,2.82 C44.1@1432,2.82
PWR_KEY_L: D1.2 U10.V27 | length 2492.9
  Top Layer w6: v1(1532,1695) 1532,1694.39 1544.69,1681.7 U10.V27@1544.69,1681.1
  Routing 4 w6: v2(1429.1,-53.41) 1429.1,492.1 1467,530 1467,958 1017,1408 1017,1670 1059.09,1712.09 1489.91,1712.09 1507,1695 v1(1532,1695)
  Bottom Layer w20: v2(1429.1,-53.41) 1431.87,-56.18 D1.2@1436.72,-56.18
PWR_ON: D1.1 D2.2 R20.1 SW2.1 | length 255.3
  Top Layer w25: SW2.1@1313.03,2.35 v2(1332.82,2.35) SW2.1@1464.61,2.35
  Bottom Layer w12: D2.2@1456.09,56.82 1459,53.91 v1(1459,20)
  Bottom Layer w25: R20.1@1332.82,2.82 v2(1332.82,2.35) 1332.82,0.32 1348.92,-15.78 D1.1@1348.92,-56.18
RECOVER: C26.2 R21.1 R23.2 U10.AH26 | length 4412.4
  Top Layer w4: v1(1540.94,1907.67) U10.AH26@1570.28,1937
  Top Layer w10: v2(218,1954) v2(370,1954)
  Routing 4 w6: v2(370,1954) 386,1938 1485.94,1938 1498.25,1925.69 1522.91,1925.69 v1(1540.94,1907.67)
  Routing 4 w8: v2(218,1954) 218,1759 218,216 393,41 574,41 690,-75 1098,-75 1114.82,-58.18 v2(1274.82,-58.18)
  Bottom Layer w20: C26.2@1168.82,-57.18 1169.32,-57.68 1274.32,-57.68 v2(1274.82,-58.18)
RESET_L: C150.1 D5.2 R40.2 SW4.1 U9.20 U10.T30 | length 3022.9
  Top Layer w6: v2(1594.39,427.87) U9.20@1634.01,427.87
  Top Layer w12: SW4.1@1544.04,2.35 1579.71,2.35 v2(1580.96,1.11) ; v2@1580.96,2.35 SW4.1@1695.61,2.35
  Routing 4 w8: v1(1459,1629.09) 1419.45,1629.09 1372.36,1582 1077.98,1582 1031,1535.02 1031,1411.97 1479,963.97 1479,460 1511.13,427.87 v2(1594.39,427.87) ; 1508.87,427.87 1508.87,425.6 1476,392.73 1476,76 1550.89,1.11 v2(1580.96,1.11) 1845.11,1.11 1865.82,21.82 v2(1865.82,78.82)
  Bottom Layer w12: C150.1@1456.64,1648.82 1459,1646.46 v1(1459,1629.09) ; v2(1580.96,1.11) 1580.96,-66.04 D5.2@1581.09,-66.18 ; R40.2@1830.82,78.82 v2(1865.82,78.82)
RTC_CLKO_SOC: R44.1 R62.2 U9.68 | length 2491.8
  Top Layer w6: U9.68@1901.73,455.42 1924.91,455.42 1928.42,458.94 1928.42,517.22 R44.1@1927.82,517.82
  Top Layer w8: R44.1@1925.63,517.52 1925.32,517.82 1894,549.14 1894,616 1917,639 v2(2064,639) ; v1(2436,796) v1(2477,840)
  Top Layer w10: R44.1@1925.32,517.82 R44.1@1927.82,517.82
  Routing 1 w8: v2(1356,1614) 1356,1579 1403,1532 1403,1322 1495,1230 2087,1230 v1(2477,840) ; v2(2064,639) 2214,789 2429,789 v1(2436,796)
  Routing 4 w8: v2@2063.5,639.5 v2(2064,639)
  Bottom Layer w8: R62.2@1355.82,1641.82 1356,1641.64 v2(1356,1614)
RTC_CLKO_WIFI: R42.1 U9.67 U17.31 | length 4111.8
  Top Layer w6: U9.67@1901.73,441.65 1933.65,441.65 1939.82,447.82 1939.82,473.82 1965.82,499.82 v2(1965.82,577.82) v2@1965.82,578.82
  Top Layer w10: U17.31@3161.95,2078.82 v2@3204.65,2078.82
  Routing 4 w10: v2(3703.82,819.82) v2(3703.82,1658.82)
  Bottom Layer w8: v2(1965.82,577.82) 2012.18,577.82 2025,565 2180.64,565 2222.82,522.82 R42.1@2222.82,439.82 2265.18,439.82 2345,360 2599,360 2648.82,409.82 3618.82,409.82 3703.82,494.82 v2(3703.82,819.82)
  Bottom Layer w10: v2(3204.65,2078.97) 3483.03,2078.97 3703.82,1858.18 v2(3703.82,1658.82)
SDI0_WiFi.SDIO0_CLK: J8.6 U10.AF7 U17.18 | length 3051.9
  Top Layer w6: U10.AF7@2056.5,1885.82 2056.5,1886.16 2068.86,1898.52 v1(2068.86,1898.86)
  Top Layer w12: v2(3462.54,1997.46) U17.18@3462.54,2322.52 3462.54,2558.79 3608.82,2705.08 3608.82,2906.82 v2(3577.82,2937.82)
  Routing 1 w12: v1(2695,1881.08) 2727.08,1849 3417,1849 3462.54,1894.54 v2(3462.54,1997.46)
  Bottom Layer w6: v1(2068.86,1898.86) 2104.14,1898.86 2130.91,1872.09 2399.22,1872.09 2408.2,1881.08 v1(2695,1881.08)
  Bottom Layer w10: J8.6@3466.82,3350.82 3598.82,3218.82 3598.82,2958.82 v2(3577.82,2937.82)
SDI0_WiFi.SDIO0_CMD: U10.AH6 U17.17 | length 1727.4
  Top Layer w6: v1(2067.82,1951.56) 2082.09,1937.29 U10.AH6@2082.09,1937
  Top Layer w10: U17.17@3497.97,2322.52 3497.97,2180.15 v2(3498.12,2180)
  Routing 1 w6: v1(2067.82,1951.56) 2067.82,2018.82 2169,2120 3438.12,2120 v2(3498.12,2180)
SDI0_WiFi.SDIO0_D0: J8.2 U10.AD8 U17.21 | length 3070.4
  Top Layer w6: U10.AD8@2030.91,1834.64 2030.91,1834.77 2040.82,1844.69 v1(2040.82,1844.82)
  Top Layer w10: v2(3355.82,2279.82) U17.21@3355.82,2322.11
  Routing 1 w10: v2(2978,2230) 3306,2230 v2(3355.82,2279.82)
  Bottom Layer w5: v1(2040.82,1844.82) 2057,1861 2953,1861 2978,1886 v2@2978,2227
  Bottom Layer w10: v2(3355.82,2279.82) 3355.82,2448.82 3663.82,2756.82 3663.82,3211.82 3717.82,3265.82 3781.82,3265.82 J8.2@3866.82,3350.82
SDI0_WiFi.SDIO0_D1: J8.3 U10.AK5 U17.22 | length 2801.3
  Top Layer w4: U10.AK5@2107.68,1988.18 2120.48,2000.98 2120.48,2025.17 2145.13,2049.82 2160,2049.82
  Top Layer w5: 2160,2049.82 3063.82,2049.82 3100,2086 3100,2205 v2(3056,2249)
  Top Layer w10: v2(3320.82,2279.82) U17.22@3320.82,2318.82
  Routing 1 w6: v2@3056,2246 v2@3057.57,2246
  Routing 1 w10: v2@3056.84,2249 3290,2249 v2(3320.82,2279.82)
  Bottom Layer w10: v2(3320.82,2279.82) 3320.82,2435.04 3647.82,2762.04 3647.82,3231.82 J8.3@3766.82,3350.82
SDI0_WiFi.SDIO0_D2: J8.4 U10.AG7 U17.20 | length 2938.1
  Top Layer w6: U10.AG7@2056.5,1911.41 2058.39,1911.41 2064.89,1917.91 2066.62,1917.91 v1(2067.35,1918.64)
  Top Layer w10: v2@3391.67,2279.82 U17.20@3391.67,2322.52
  Routing 1 w10: v2(2609,2212) 3281,2212 3324,2212 v2(3391.82,2279.82)
  Bottom Layer w6: v1(2067.35,1918.64) 2104.35,1918.64 2139.91,1883.09 2261.59,1883.09 2328.5,1950 2405,1950 2609,2154 v2(2609,2212)
  Bottom Layer w10: v2(3391.82,2279.82) 3371.82,2259.82 3309.82,2259.82 3291.82,2277.82 3291.82,2427.25 3631.82,2767.25 3631.82,3241.82 3666.82,3276.82 J8.4@3666.82,3350.82
SDI0_WiFi.SDIO0_D3: J8.5 U10.AE8 U17.19 | length 3227.8
  Top Layer w6: U10.AE8@2030.91,1860.23 2055.37,1860.23 v1(2069.93,1845.67)
  Top Layer w10: v2@3427.11,2279.82 U17.19@3427.11,2322.52
  Routing 1 w10: v2(3003,2193) 3340.43,2193 v2(3427.26,2279.82)
  Bottom Layer w6: v1(2069.93,1845.67) 2967.67,1845.67 3003,1881 v2@3003,2190
  Bottom Layer w10: v2(3427.26,2279.82) 3391.26,2243.82 3296.82,2243.82 3274.73,2265.92 3274.73,2431.73 3615.82,2772.82 3615.82,3243.18 3566.82,3292.18 J8.5@3566.82,3350.82
SDI0_WiFi.WIFI_HOST_WAKE_L: U10.V31 U17.16 | length 2872.1
  Top Layer w4: v2(1352,2029) 1352,1735 1405.9,1681.1 U10.V31@1442.33,1681.1
  Top Layer w10: v2@3533.41,2279.82 U17.16@3533.41,2322.52
  Routing 1 w6: v2(1394,2195) 1425,2226 2109,2226 2187,2148 3401.73,2148 v2(3533.55,2279.82)
  Routing 4 w4: v2(1352,2029) 1352,2153 v2(1394,2195)
SDMMC0_CLK: D14.1 J1.5 P30.2 R69.1 | length 4786.7
  Top Layer w12: P30.2@-42.18,2379.82 185.82,2379.82 v3(253,2447) ; v2(4164,2968) 4164,2960.64 4177.82,2946.82 4218.09,2946.82 D14.1@4219.09,2945.82
  Routing 1 w6: v2(2467,2552.4) v2(3783,2552.4)
  Routing 4 w10: v2(993.49,2552) v2(1857,2552)
  Routing 4 w12: v3(253,2447) 345,2447 450,2552 v2(738,2552)
  Bottom Layer w6: v2(738,2552) v2(993.49,2552) ; v2(1857,2552) v2@1857.4,2552.4 ; v2(3783,2552.4) 3803.4,2552.4 3859,2608 3859,2666.59 3899.3,2706.89 4113.03,2706.89 4152,2745.85 4152,2956 v2(4164,2968)
  Bottom Layer w10: v2@1857.4,2552.4 v2(2467,2552.4) v2@2468,2552.4
  Bottom Layer w12: P30.2@-42.18,2379.82 R69.1@28.82,2379.82 ; v2(4164,2968) 4201.22,2968 J1.5@4202.41,2966.81
SDMMC0_CMD: D12.1 J1.3 P30.1 R67.2 | length 4954.9
  Top Layer w12: v2(4169.96,2880.19) D12.1@4217.46,2880.19
  Routing 1 w6: v2(2518,2471) 2518.5,2471.5 v2(3783,2471.5)
  Routing 1 w12: P30.1@-42.18,2279.82 73,2395 v3(73,2479)
  Routing 4 w10: v2(1009,2479) 2509.51,2479 v2@2517.51,2471
  Bottom Layer w6: v2(3783,2471.5) 3892,2580.5 3892,2650 3913.82,2671.82 4223.82,2671.82 4271.82,2719.82 4271.82,2848.53 4240.16,2880.19 J1.3@4202.41,2880.19
  Bottom Layer w10: v3(73,2479) v2(1009,2479)
  Bottom Layer w12: P30.1@-42.18,2279.82 -41.18,2278.82 R67.2@28.82,2278.82 ; v2(4169.96,2880.19) J1.3@4202.41,2880.19
SDMMC0_D0: D9.1 J1.7 R68.2 | length 3554.1
  Top Layer w10: R68.2@1525.37,2138.82 1525.37,2195.37 1555,2225 v2(1555,2574)
  Top Layer w12: v2(4164.82,3052.82) 4185.82,3031.82 D9.1@4218.09,3031.82
  Routing 1 w6: v2(2467,2574) 2467.2,2574.2 v2(3783,2574.2)
  Bottom Layer w6: v2(1555,2574) v2(2467,2574) ; v2(3783,2574.2) 3809.2,2574.2 3848,2613 3848,2671.37 3894.52,2717.89 4107.06,2717.89 4134,2744.82 4134,2747.65 4140.96,2754.61 4140.96,3028.96 v2(4164.82,3052.82)
  Bottom Layer w12: v2(4164.82,3052.82) J1.7@4204.82,3052.82
SDMMC0_D1: D11.1 J1.8 R70.2 | length 3673.1
  Top Layer w10: v2(1580,2596) 1580.14,2595.86 R70.2@1580.14,2138.82
  Top Layer w12: v2(4164.82,3096.82) 4141.82,3073.82 4141.82,3019.82 4172.82,2988.82 4214.82,2988.82 D11.1@4216.82,2986.82
  Routing 1 w6: v2(2467,2596) v2(3783,2596)
  Bottom Layer w6: v2(1580,2596) v2(2467,2596) ; v2(3783,2596) 3811.98,2596 3837,2621.02 3837,2675.93 3889.96,2728.89 4101.09,2728.89 4123,2750.79 4123,2752.21 4129.96,2759.16 4129.96,3061.96 v2(4164.82,3096.82)
  Bottom Layer w12: v2(4164.82,3096.82) J1.8@4202.82,3096.82
SDMMC0_D2: D13.1 J1.1 P31.1 R71.2 | length 6200.9
  Top Layer w6: v2(993.49,2497.55) v2(1374.55,2497.55) 1375,2497.09 1375,2346 1415.82,2305.18 R71.2@1415.82,2138.82
  Top Layer w12: P31.1@-42.18,1085.45 118.45,1085.45 340.82,1307.82 v2(340.82,1666) ; v2(4169.96,2793.82) D13.1@4218.09,2793.82
  Routing 1 w6: v2(1374.55,2497.55) 1394,2517 v2(1821,2517) ; v2(2468,2517) 3041.67,2517 3055.27,2530.6 v2(3783,2530.6)
  Routing 4 w12: v2(340.82,1666) 340.82,2393.82 444.55,2497.55 v2(736.18,2497.55)
  Bottom Layer w6: v2(736.18,2497.55) v2(993.49,2497.55) ; v2(1821,2517) v2(2468,2517) ; v2(3783,2530.6) 3798.04,2530.6 3870,2602.56 3870,2661.94 3903.88,2695.82 4213.88,2695.82 4247.82,2729.76 4247.82,2781.82 4235.82,2793.82 J1.1@4201.82,2793.82
  Bottom Layer w12: v2(4169.96,2793.82) J1.1@4201.82,2793.82
SDMMC0_D3: D10.1 J1.2 P31.2 R72.2 | length 6261.9
  Top Layer w6: v2(1118.09,2523.78) 1372.22,2523.78 v2(1398,2498) 1398,2343 1470.59,2270.41 R72.2@1470.59,2138.82
  Top Layer w12: P31.2@-42.18,1185.45 191.45,1185.45 313.82,1307.82 v2(313.82,1666) ; v2(4169.96,2836.82) D10.1@4221.82,2836.82
  Routing 1 w6: v2(1398,2498) v2(1820.57,2498) ; v2(2468,2497.82) v2(3783,2497.82) ; v2@3781.89,2498.89 v2@3783,2500
  Routing 4 w12: v2(313.82,1666) 313.82,2391.78 445.86,2523.82 v2(736.18,2523.82)
  Bottom Layer w6: v2(1820.57,2498) 1820.66,2497.91 v2@2468,2497.91 ; v2(3783,2497.82) 3881,2595.82 3881,2655.97 3908.85,2683.82 4218.85,2683.82 4259.82,2724.79 4259.82,2812.82 4235.76,2836.89 4202.89,2836.89 J1.2@4202.82,2836.82
  Bottom Layer w12: v2(736.18,2523.82) 1118.04,2523.82 v2(1118.09,2523.78) ; v2(4169.96,2836.82) J1.2@4202.82,2836.82
SDMMC0_DET_L: J1.10 P33.1 U10.V28 | length 5888.7
  Top Layer w4: v1(1515,1709) 1515,1699.1 1519.1,1695 U10.V28@1519.1,1681.1
  Top Layer w12: P33.1@576.82,1937.82 578.18,1937.82 v2(665,1851) ; v2(889,3129) 1216,3456 2342,3456 2782,3016 v2(3151,3016)
  Routing 1 w12: v2(889,3129) 688,3129 601,3042 601,1915 v2(665,1851) 708,1808 1097,1808 v2(1137,1768) ; v2(3151,3016) 3240,3105 3531.68,3105 v2(3708.71,2927.96)
  Routing 4 w4: v2(1137,1768) 1181,1724 1500,1724 v1(1515,1709)
  Bottom Layer w12: J1.10@3708.71,2891.02 v2(3708.71,2927.96)
SDMMC0_PWR: R27.1 U8.3 U10.AG4 | length 2489.2
  Top Layer w6: U10.AG4@2133.2,1911.34 U10.AG4@2133.27,1911.41 ; U10.AG4@2134.23,1911.97 2134.31,1911.97 2142.52,1920.17 v1(2143,1920.17)
  Routing 1 w6: v1@2143.36,1919.82 2152.17,1911 2458,1911 2756,1613 v2(2756,1576)
  Routing 4 w12: v2(2756,1576) 3003,1576 3258,1321 3258,286 v2(3279,265)
  Bottom Layer w12: v2(3279,265) 3279,249.64 R27.1@3287.82,240.82
SDMMC0_VDDPST: C151.2 U10.U26
  other v1: 1570.15,1655.92
SPI1_CLK: P27.5 SB8.1 | length 1394
  Top Layer w12: P27.5@-42.18,1445.82 31.12,1445.82 268.3,1683 1047.64,1683 1080.82,1649.82 SB8.1@1239.82,1649.82
SPI1_CSN0: P27.4 SB9.1 | length 1302.7
  Top Layer w12: v2(812.82,1595.82) SB9.1@1239.82,1595.82
  Bottom Layer w12: P27.4@-42.18,1545.82 7.82,1595.82 v2(812.82,1595.82)
SPI1_RXD/UART4_RXD: P27.2 U10.P27 | length 1834.5
  Top Layer w6: U10.P27@1544.69,1578.74 1544.69,1577.17 1554,1567.85 v1(1554,1566.81)
  Routing 4 w4: v2(1034,1663) 1090,1607 1330,1607 1365,1642 1464,1642 1539.19,1566.81 v1(1554,1566.81)
  Bottom Layer w12: P27.2@-42.18,1745.82 49.82,1745.82 194,1890 807,1890 v2(1034,1663)
SPI1_TXD/UART4_TXD: P27.3 U10.R31 | length 2281.4
  Top Layer w5: v2(986,1274) 1016.58,1243.42 1170,1243.42 ; 1170,1243.42 1323.42,1243.42 1350,1270 1350,1458 1324,1484 1324,1513 1395,1584 1421.67,1584 U10.R31@1441.99,1604.33
  Top Layer w6: U10.R31@1441.99,1604.33 U10.R31@1442.33,1604.33
  Routing 1 w12: P27.3@-42.18,1645.82 -92.18,1595.82 -92.18,1306.82 -20.36,1235 947,1235 v2(986,1274)
STM_I2C.STM_SCL: R96.2 U10.AG1 U14.16 | length 1887.9
  Top Layer w5: U10.AG1@2210.04,1911.41 2240.71,1942.08 2240.71,1956.71 v1(2241,1957)
  Top Layer w10: v2(2889.5,2612.82) R96.2@3226.82,2612.82 ; R96.2@3226.82,2609.82 R96.2@3226.82,2612.82 ; U14.16@3336.7,2737.44 3336.7,2715.7 3325.82,2704.82 3245.82,2704.82 3226.82,2685.82 R96.2@3226.82,2612.82
  Routing 1 w6: v1(2241,1957) 2241,1985.03 2304.97,2049 2339.13,2049 2389.13,2099 2865,2099 v1(2889.5,2074.5)
  Bottom Layer w8: v1(2889.5,2074.5) v2(2889.5,2612.82)
STM_I2C.STM_SDA: R97.2 U10.Y6 U14.17 | length 2120
  Top Layer w6: U10.Y6@2082.09,1732.28 v1(2094.89,1745.07)
  Top Layer w10: U14.17@3356.39,2737.44 3356.39,2709.61 v1(3369,2697)
  Routing 4 w6: v1(2094.89,1745.07) 2837.07,1745.07 2916,1824 v2(2916,1944)
  Routing 4 w10: v2(3255.82,2664.82) 3336.82,2664.82 v1(3369,2697)
  Bottom Layer w10: v2(2916,1944) 2916,2486 3094.82,2664.82 v2(3255.82,2664.82)
SWCLK_DSP: P38.2 U14.37 | length 1194.9
  Top Layer w12: P38.2@2543.82,3450.82 2824.82,3169.82 3421.82,3169.82 3494.18,3097.46 U14.37@3494.18,2999.25
SWDIO_DSP: P38.1 U14.34 | length 1459
  Top Layer w10: U14.34@3516.82,2937.25 3517.04,2937.04 3517.25,2937.25 3545.76,2937.25 3555.51,2947 v2(3556,2947)
  Top Layer w12: v2(3150.82,3204.82) 3444.82,3204.82 v2(3479.82,3169.82)
  Routing 4 w12: v2(3479.82,3169.82) 3511,3138.64 3511,2977 3541,2947 v2(3556,2947)
  Bottom Layer w12: P38.1@2443.82,3450.82 2689.82,3204.82 v2(3150.82,3204.82)
TB1: C155.1 R73.2 U10.V24 | length 441.1
  Top Layer w4: R73.2@1299.64,1770 R73.2@1299.82,1769.82 ; U10.V24@1621.46,1681.1 U10.V24@1621.46,1681.78
  Top Layer w6: v1(1612,1690) 1612.28,1690 1620.5,1681.78 U10.V24@1621.46,1681.78
  Routing 4 w4: v2(1266,1770) 1526,1770 1598,1698 1604.14,1698 v1@1612.14,1690
  Bottom Layer w4: C155.1@1658.5,1692 C155.1@1659,1691.5
  Bottom Layer w8: v1(1612,1690) 1630.92,1690 1632.92,1692 C155.1@1658.5,1692
TB2: C156.1 R74.2 U10.U24 | length 397.3
  Top Layer w4: R74.2@1299.82,1709.02 R74.2@1300,1708.85 ; U10.U24@1621.46,1655.51 U10.U24@1622.98,1655.51
  Top Layer w8: U10.U24@1622.98,1655.51 1622.98,1656.51 1629.48,1663 v2(1630,1663)
  Routing 4 w4: v2(1300,1681) 1311.18,1669.82 1342.82,1669.82 1351,1678 1488,1678 1524,1642 1574,1642 1595,1663 v2(1630,1663)
  Bottom Layer w4: v2(1630,1663) 1630,1644 C156.1@1633,1641
TYPEC0_AUX_N: C168.2 D18.4 D18.7 J4.B8 R87.2 R89.2 | length 454.9
  Top Layer w10: v2(803.32,3253.82) R87.2@805.82,3253.82
  Top Layer w12: J4.B8@815.19,3373.11 v2(815.19,3435.45)
  Routing 4 w8: v2(803.32,3253.82) 815.19,3265.69 v2(815.19,3435.45)
  Bottom Layer w5: D18.7@755.63,3363.5 D18.4@755.63,3332 755.63,3278.01 776.01,3257.64 R89.2@786.38,3257.64
  Bottom Layer w6: C168.2@843.32,3253.82 C168.2@847.32,3257.82
  Bottom Layer w8: R89.2@786.38,3259.38 797.77,3259.38 v2(803.32,3253.82) 805.82,3256.32 R89.2@805.82,3258.82 ; R89.2@797.01,3257.64 R89.2@800.82,3253.82
  Bottom Layer w12: R89.2@800.82,3253.82 805.82,3253.82 C168.2@843.32,3253.82
TYPEC0_AUX_P: C167.2 D18.5 D18.6 J4.A8 R86.2 R88.2 | length 225.8
  Top Layer w6: v2(735.36,3283.36) 746.29,3294.29 J4.A8@746.29,3323.89
  Top Layer w10: R86.2@733.82,3254.82 735.36,3256.36 v2@735.36,3282.87
  Bottom Layer w8: R88.2@733.82,3257.82 735.36,3259.36 v2(735.36,3283.36) 735.94,3283.94 D18.5@735.94,3332 D18.6@735.94,3363.5
  Bottom Layer w12: C167.2@688.32,3257.82 R88.2@733.82,3257.82
TYPEC0_CC1: D23.1 J4.A5 U13.10 U13.11 | length 456.8
  Top Layer w6: J4.A5@805.35,3323.89 806.44,3322.81 806.44,3304.57 828,3283 v2(828,3156)
  Top Layer w8: U13.11@661.35,3110.33 v2(661.35,3142.56)
  Top Layer w12: U13.11@661.35,3110.33 674.24,3097.44 U13.10@674.24,3087.6
  Bottom Layer w8: D23.1@683.73,3179 681.57,3179 674.83,3172.26 674.83,3170.1 661.35,3156.62 v2(661.35,3142.56) 814.56,3142.56 v2(828,3156)
TYPEC0_CC2: D24.1 J4.B5 U13.1 U13.14 | length 548.7
  Top Layer w10: J4.B5@736.45,3373.11 v2(736.45,3420.45)
  Top Layer w12: U13.1@583.99,3087.51 589.31,3087.51 589.41,3087.6 589.41,3097.44 602.29,3110.33 U13.14@602.29,3115.66 v2(602.29,3179.09)
  Routing 4 w6: v3(555,3257.82) 590.82,3257.82 736.45,3403.45 v2(736.45,3420.45)
  Bottom Layer w10: v3(555,3257.82) 555,3200 575.91,3179.09 v2(602.29,3179.09)
  Bottom Layer w12: v2(602.29,3179.09) D24.1@628.82,3179.09
TYPEC0_D_N: D18.1 D18.10 J4.A7 J4.B7 U10.AH23 | length 2401.9
  Top Layer w5: J4.A7@765.98,3323.89 765.99,3291.41 772.28,3285.11 v2@798.89,3285.11 ; v2(784.23,3429) 782.92,3427.7 782.92,3423.27 782.32,3422.67 782.32,3376.03 785.25,3373.11 J4.B7@795.51,3373.11
  Top Layer w6: U10.AH23@1647.05,1937 1648.27,1937 1654.06,1931.21 v2@1661.49,1931.21
  Top Layer w8: J4.B7@794.59,3383.87 795.51,3382.95 J4.B7@795.51,3373.11
  Routing 4 w5: v2(784.23,3429) 782.92,3427.7 782.92,3423.82 781.6,3422.5 781.6,3413.6 762.89,3394.89 762.89,3261.89 707,3206 707,2654.38 1376.38,1985 1527,1985 1592.81,1919.19 1625.81,1919.19 1637.32,1930.71 1660.67,1930.71 1661.27,1931.31 1665.7,1931.31 v2(1667,1932.61)
  Bottom Layer w5: v2(784.23,3429) 784.59,3428.64 784.59,3420.4 814.68,3390.3 D18.10@814.69,3363.5 814.68,3339.87 814.69,3324.13 811.34,3320.78 811.34,3302.26 802.02,3292.94 802.02,3292.09 798.89,3288.96 v2(798.89,3287.11)
TYPEC0_D_P: D18.2 D18.9 J4.A6 J4.B6 U10.AG23 | length 2367.9
  Top Layer w5: J4.B6@756.14,3373.11 766.39,3373.11 769.32,3376.03 769.32,3422.67 768.72,3423.27 768.72,3427.7 v2(767.42,3429) ; J4.A6@785.67,3323.89 787,3322.56 v2(787,3299)
  Top Layer w6: U10.AG23@1647.05,1911.41 1648.27,1911.41 1654.06,1917.21 v2@1661.49,1917.21
  Top Layer w8: J4.B6@756.14,3373.11 J4.B6@756.14,3382.95
  Routing 4 w5: v2(767.42,3429) 768.72,3427.7 768.72,3423.66 769.71,3422.67 769.71,3418.52 751,3399.81 751,3268.38 694,3211.38 694,2649 1371,1972 1521.62,1972 1587.42,1906.19 1631.19,1906.19 1642.71,1917.71 1660.67,1917.71 1661.27,1917.11 1665.7,1917.11 v2(1667,1915.8)
  Bottom Layer w5: v2(767.42,3429) 767.42,3427.16 771.59,3422.99 771.59,3415.02 795,3391.6 D18.9@795,3363.5 795,3324.13 798.34,3320.78 798.34,3307.65 792.83,3302.13 791.97,3302.13 788.84,3299 v2(787,3299)
TYPEC0_RX1_N: D19.5 D19.6 J4.B10 U10.AL21 | length 2427.4
  Top Layer w8: J4.B10@854.56,3373.11 855.48,3374.03 855.48,3385.71 856.63,3386.86 856.63,3412.07 v2(855.63,3413.07)
  Routing 1 w5: v2(892,2634.81) 890.7,2633.51 886.27,2633.51 885.67,2632.91 869.56,2632.91 859.02,2622.36 859.02,2607.45 863,2603.47 863,2405.62 1411.62,1857 1671.38,1857 1727,1912.62 1727,1985.01 1698.23,2013.77 v1(1698.23,2013.92)
  Routing 4 w6: v2@856.13,3412.57 856.13,3360.72 904.82,3312.03 904.82,2640.68 899.68,2635.54 892.73,2635.54 v2(892,2634.81)
  Routing 4 w8: v2(855.63,3413.07) v2@856.13,3412.57
  Bottom Layer w8: D19.5@842.94,3324.25 D19.5@842.94,3332 842.94,3347.75 844.79,3349.59 844.79,3385.25 854.9,3395.37 854.9,3412.34 v2(855.63,3413.07)
TYPEC0_RX1_P: D19.4 D19.7 J4.B11 U10.AK21 | length 2427.2
  Top Layer w8: v2(872.63,3413.07) 872.63,3386.41 873.33,3385.71 873.33,3374.03 J4.B11@874.25,3373.11
  Routing 1 w5: v2(892,2618) 890.7,2619.3 886.27,2619.3 885.67,2619.91 874.95,2619.91 872.02,2616.98 872.02,2612.83 876,2608.85 876,2411 1417,1870 1666,1870 1714,1918 1714,1979.62 1705.62,1988 1698.31,1988 v1(1698.23,1988.08)
  Routing 4 w6: v2@872.13,3409.87 872.13,3367.35 921.56,3317.92 921.56,3214.83 921.56,3126.31 929.56,3118.31 955.28,3118.31 963.28,3110.31 955.28,3102.31 929.56,3102.31 921.56,3094.31 921.56,3075.31 921.56,2634.79 905.5,2618.73 v2@892.3,2618.73
  Routing 4 w8: v2@872.13,3409.87 872.63,3410.37 v2(872.63,3413.07)
  Bottom Layer w8: D19.4@862.63,3324.25 D19.4@862.63,3332 862.63,3347.75 860.79,3349.59 860.79,3378.63 872.63,3390.47 v2(872.63,3413.07)